# Altium PCB Zotino.PCBDOC (part 7 of 10)
Units mm, origin at the board's own origin, x right, y up, seen from the top; angles counter-clockwise.
Board outline 160.1 x 100.1 mm, 4 copper layers (TopLayer, Internal Plane 2, Signal Layer 1, BottomLayer), stack 1.563 mm thick; 759 components, 378 nets, 2272 pads, 779 vias.
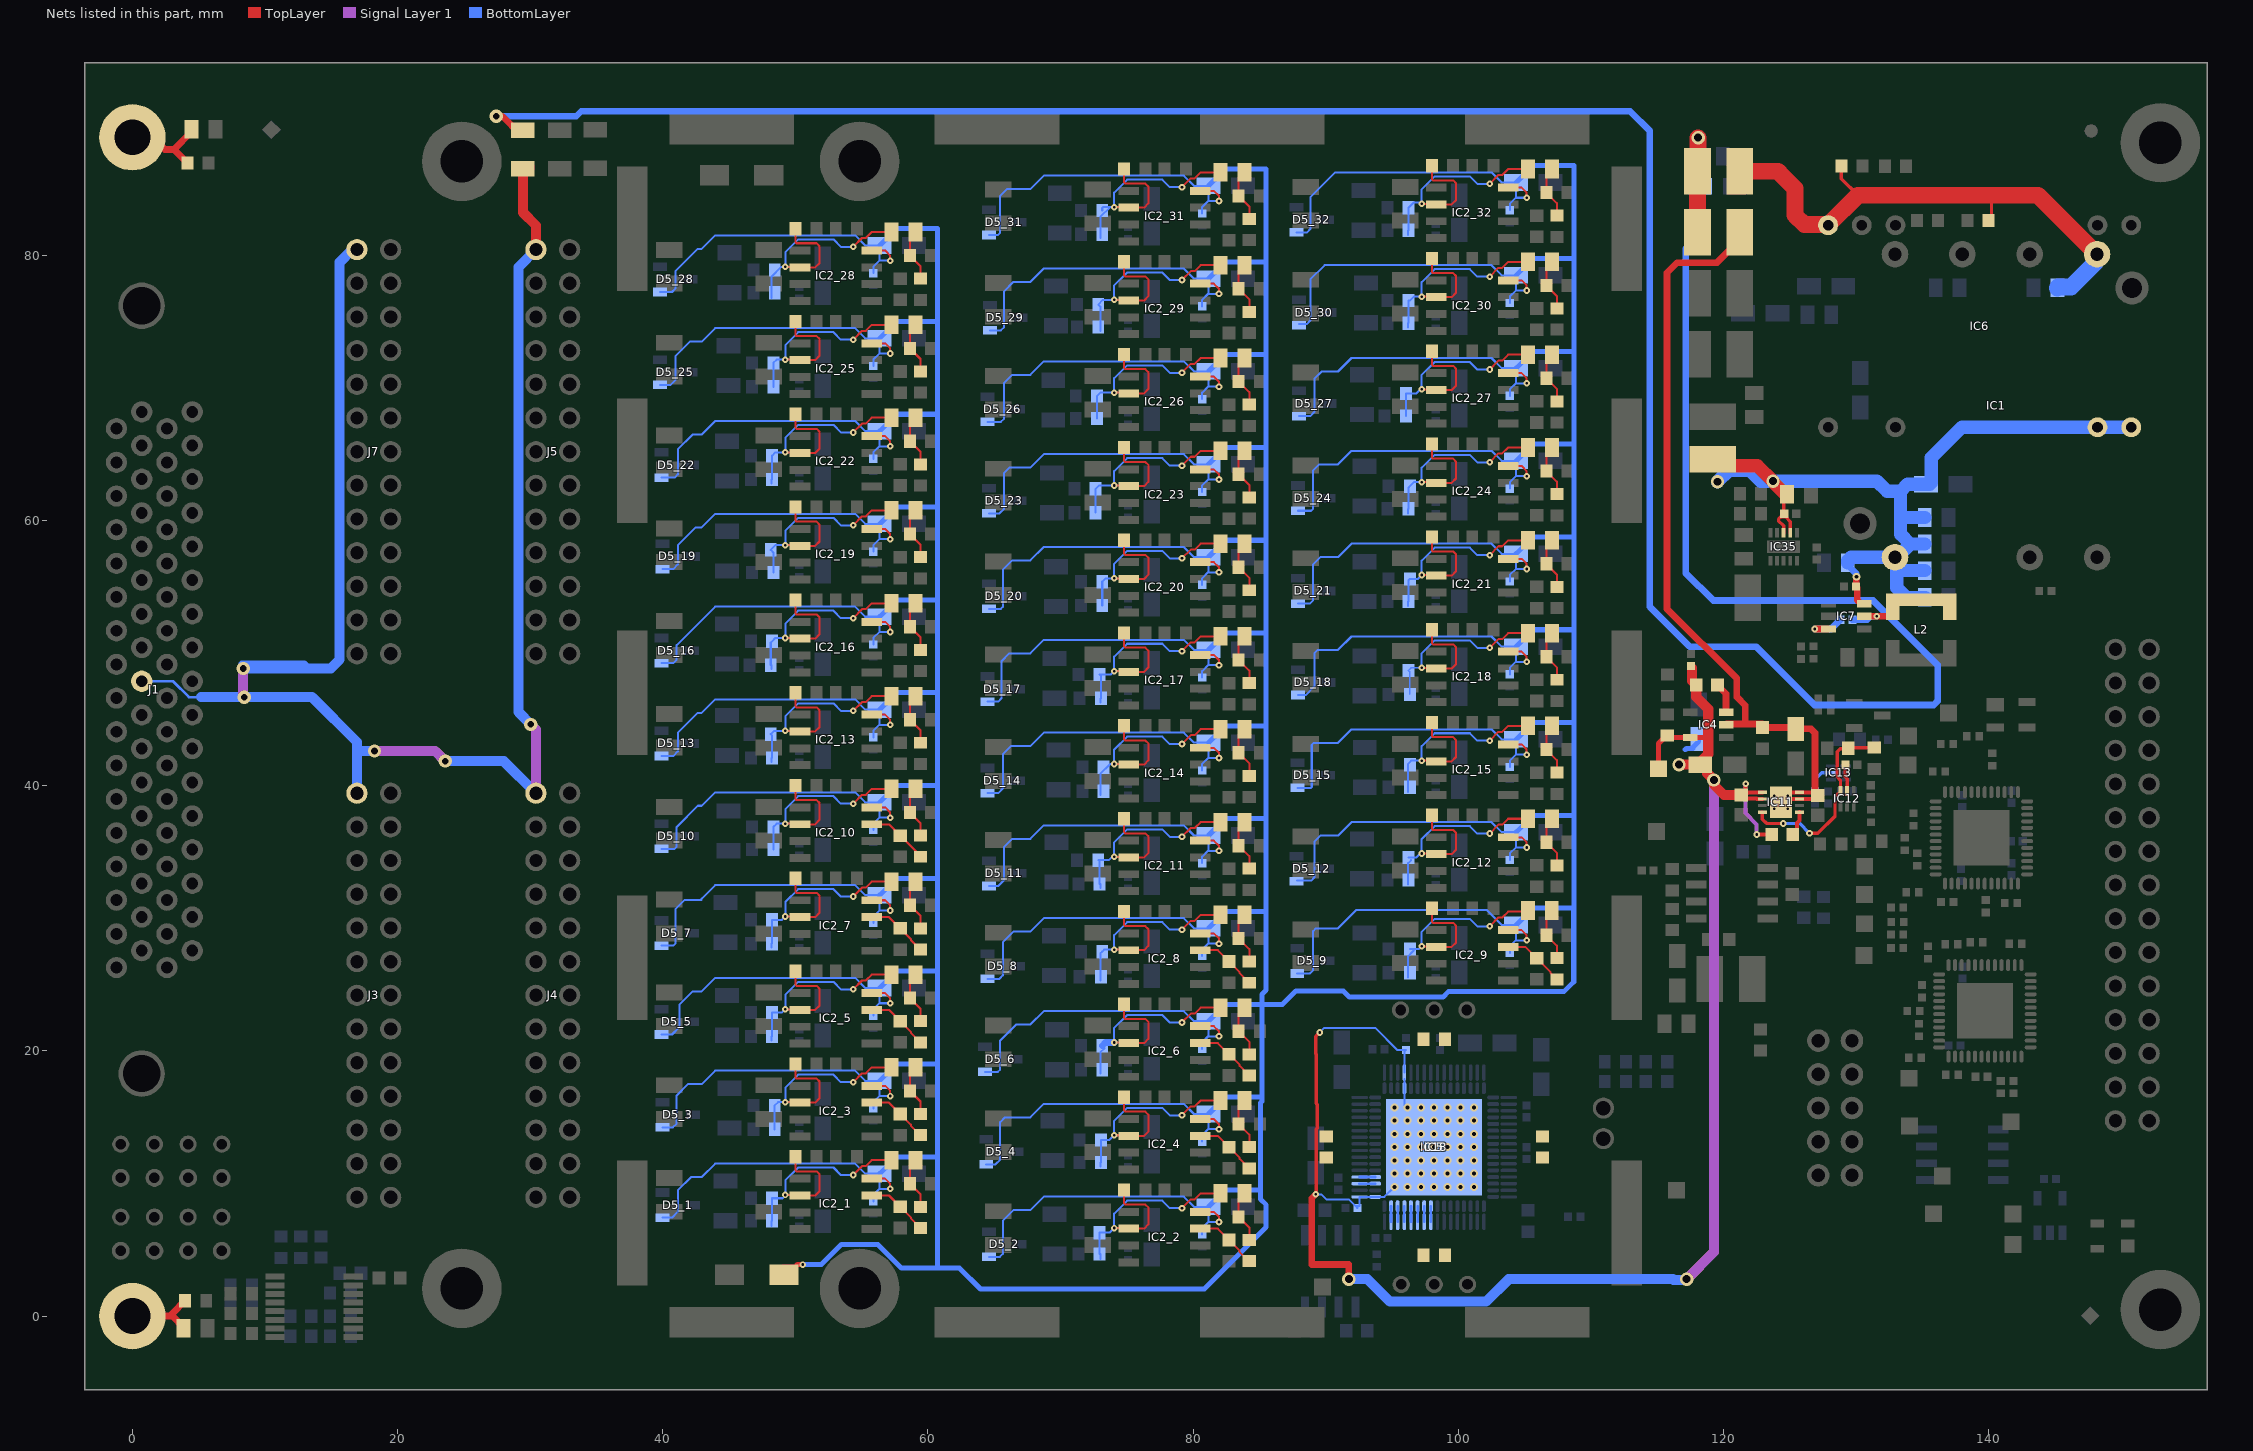
[diagram p7: the nets of this part, all layers, seen from the top]

## Via types
v1: diameter 0.5, hole 0.2, TopLayer to BottomLayer, tented both sides, 659 vias
v2: diameter 0.6, hole 0.3, TopLayer to BottomLayer, tented both sides, 56 vias
v3: diameter 1, hole 0.6, TopLayer to BottomLayer, tented both sides, 26 vias
v4: diameter 0.6, hole 0.3, TopLayer to BottomLayer, 18 vias
v5: diameter 1, hole 0.5, TopLayer to BottomLayer, tented both sides, 9 vias
v6: diameter 0.5, hole 0.2, TopLayer to BottomLayer, tented bottom, 7 vias
v7: diameter 0.5, hole 0.2, TopLayer to BottomLayer, 4 vias

## Nets (pads, with @x,y where several pads share a name; then routed paths per layer and width w, separated by ;. In a path a pad name is that pad's centre, name@x,y a point inside that pad or via, vN(x,y) a via of type N, cw(c..) or ccw(c..) an arc to the next point about the centre after c; other vN are vias at no path point) (continued)
N12V0A: C1.2 C5.2 C6.1 C27.1 C29.2 C50.2 C53.2 C92_1.2 C92_2.2 C92_3.2 C92_4.2 C92_5.2 C92_6.2 C92_7.2 C92_8.2 C92_9.2 C92_10.2 C92_11.2 C92_12.2 C92_13.2 C92_14.2 C92_15.2 C92_16.2 C92_17.2 C92_18.2 C92_19.2 C92_20.2 C92_21.2 C92_22.2 C92_23.2 C92_24.2 C92_25.2 C92_26.2 C92_27.2 C92_28.2 C92_29.2 C92_30.2 C92_31.2 C92_32.2 C93_1.2 C93_2.2 C93_3.2 C93_4.2 C93_5.2 C93_6.2 C93_7.2 C93_8.2 C93_9.2 C93_10.2 C93_11.2 C93_12.2 C93_13.2 C93_14.2 C93_15.2 C93_16.2 C93_17.2 C93_18.2 C93_19.2 C93_20.2 C93_21.2 C93_22.2 C93_23.2 C93_24.2 C93_25.2 C93_26.2 C93_27.2 C93_28.2 C93_29.2 C93_30.2 C93_31.2 C93_32.2 C147.2 D2.2 D5_1.1 D5_2.1 D5_3.1 D5_4.1 D5_5.1 D5_6.1 D5_7.1 D5_8.1 D5_9.1 D5_10.1 D5_11.1 D5_12.1 D5_13.1 D5_14.1 D5_15.1 D5_16.1 D5_17.1 D5_18.1 D5_19.1 D5_20.1 D5_21.1 D5_22.1 D5_23.1 D5_24.1 D5_25.1 D5_26.1 D5_27.1 D5_28.1 D5_29.1 D5_30.1 D5_31.1 D5_32.1 IC2_1.4 IC2_2.4 IC2_3.4 IC2_4.4 IC2_5.4 IC2_6.4 IC2_7.4 IC2_8.4 IC2_9.4 IC2_10.4 IC2_11.4 IC2_12.4 IC2_13.4 IC2_14.4 IC2_15.4 IC2_16.4 IC2_17.4 IC2_18.4 IC2_19.4 IC2_20.4 IC2_21.4 IC2_22.4 IC2_23.4 IC2_24.4 IC2_25.4 IC2_26.4 IC2_27.4 IC2_28.4 IC2_29.4 IC2_30.4 IC2_31.4 IC2_32.4 IC4.5 IC5.17 IC5.36 IC11.1 IC11.2 IC18.17 IC18.36 IC18.65 R8.1 R8.2 R9.1 R9.2 R10.1 R10.2 R12.1 R12.2 R69.2 TP9.1 | length 1380.1
  TopLayer w0.152: IC2_1.4@55.751,10.363 56.769,10.363 57.15,9.982 v1(57.15,9.594) ; IC2_3.4@55.751,17.363 56.769,17.363 57.15,16.982 v1(57.15,16.594) ; IC2_5.4@55.751,24.363 56.769,24.363 57.15,23.982 v1(57.15,23.594) ; IC2_7.4@55.751,31.363 56.769,31.363 57.15,30.982 v1(57.15,30.594) ; IC2_10.4@55.751,38.363 56.769,38.363 57.15,37.982 v1(57.15,37.594) ; IC2_13.4@55.751,45.363 56.769,45.363 57.15,44.982 v1(57.15,44.594) ; IC2_16.4@55.751,52.363 56.769,52.363 57.15,51.982 v1(57.15,51.594) ; IC2_19.4@55.751,59.363 56.769,59.363 57.15,58.982 v1(57.15,58.594) ; IC2_22.4@55.751,66.363 56.769,66.363 57.15,65.982 v1(57.15,65.594) ; IC2_25.4@55.751,73.363 56.769,73.363 57.15,72.982 v1(57.15,72.594) ; IC2_28.4@55.751,80.363 56.769,80.363 57.15,79.982 v1(57.15,79.594) ; IC2_2.4@80.551,7.863 81.569,7.863 81.95,7.482 v1(81.95,7.094) ; IC2_4.4@80.551,14.863 81.569,14.863 81.95,14.482 v1(81.95,14.094) ; IC2_6.4@80.551,21.863 81.569,21.863 81.95,21.482 v1(81.95,21.094) ; IC2_8.4@80.551,28.863 81.569,28.863 81.95,28.482 v1(81.95,28.094) ; IC2_11.4@80.551,35.863 81.569,35.863 81.95,35.482 v1(81.95,35.094) ; IC2_14.4@80.551,42.863 81.569,42.863 81.95,42.482 v1(81.95,42.094) ; IC2_17.4@80.551,49.863 81.569,49.863 81.95,49.482 v1(81.95,49.094) ; IC2_20.4@80.551,56.863 81.569,56.863 81.95,56.482 v1(81.95,56.094) ; IC2_23.4@80.551,63.863 81.569,63.863 81.95,63.482 v1(81.95,63.094) ; IC2_26.4@80.551,70.863 81.569,70.863 81.95,70.482 v1(81.95,70.094) ; IC2_29.4@80.551,77.863 81.569,77.863 81.95,77.482 v1(81.95,77.094) ; IC2_31.4@80.551,84.863 81.569,84.863 81.95,84.482 v1(81.95,84.094) ; IC2_9.4@103.751,29.113 104.769,29.113 105.15,28.732 v1(105.15,28.344) ; IC2_12.4@103.751,36.113 104.769,36.113 105.15,35.732 v1(105.15,35.344) ; IC2_15.4@103.751,43.113 104.769,43.113 105.15,42.732 v1(105.15,42.344) ; IC2_18.4@103.751,50.113 104.769,50.113 105.15,49.732 v1(105.15,49.344) ; IC2_21.4@103.751,57.113 104.769,57.113 105.15,56.732 v1(105.15,56.344) ; IC2_24.4@103.751,64.113 104.769,64.113 105.15,63.732 v1(105.15,63.344) ; IC2_27.4@103.751,71.113 104.769,71.113 105.15,70.732 v1(105.15,70.344) ; IC2_30.4@103.751,78.113 104.769,78.113 105.15,77.732 v1(105.15,77.344) ; IC2_32.4@103.751,85.113 104.769,85.113 105.15,84.732 v1(105.15,84.344)
  TopLayer w0.254: v1(89.244,9.188) 89.29,9.234 89.29,14.102 89.36,14.172 89.36,15.96 89.29,16.03 89.29,19.461 89.283,19.468 89.283,19.76 89.244,19.799 89.244,21.088 v1(89.544,21.388)
  TopLayer w0.3: C29.2@121.637,39.303 121.839,39.505 IC11.1@122.934,39.505 ; v1(121.669,40.142) 121.669,39.64 C29.2@121.332,39.303 121.629,39.005 121.647,39.023 122.498,39.023 122.516,39.005 IC11.2@122.934,39.005 ; v1(122.503,36.321) 123.628,36.321 C27.1@123.631,36.319
  TopLayer w0.381: D2.2@49.107,3.694 49.952,3.694 50.144,3.886 v1(50.546,3.886) ; TP9.1@115.102,41.28 115.102,43.182 115.702,43.782 115.93,43.782 116.074,43.638 IC4.5@117.45,43.638 ; IC4.5@117.366,43.554 IC4.5@117.45,43.638 ; 118.844,43.588 118.794,43.638 IC4.5@117.494,43.638 IC4.5@117.45,43.638
  TopLayer w0.508: v1(89.244,9.188) 88.944,8.888 88.944,3.888 91.744,3.888 v3(91.744,2.788)
  TopLayer w0.762: v3(116.649,41.588) C1.2@118.244,41.588 ; C5.2@117.627,48.888 117.627,47.905 C6.1@117.944,47.588 117.944,46.688 118.844,45.788 118.844,43.588 118.844,42.388 118.244,41.788 C1.2@118.244,41.588 ; C29.2@121.332,39.303 120.03,39.303 119.313,40.019 119.313,40.393 v3(119.268,40.438) 118.763,40.943 118.763,41.344 118.519,41.588 C1.2@118.244,41.588
  Signal Layer 1 w0.3: v1(121.669,40.142) 121.642,40.116 121.642,37.946 122.503,37.086 v1(122.503,36.321)
  Signal Layer 1 w0.762: v3(117.219,2.788) 119.268,4.837 v3(119.268,40.438)
  BottomLayer w0.152: D5_25.1@39.794,70.238 40.594,70.238 40.944,70.588 40.944,72.388 42.046,73.49 42.926,73.49 43.942,74.506 54.503,74.506 55.265,73.744 C93_25.2@56.358,73.744 56.358,72.624 ; D5_28.1@39.794,77.238 40.694,77.238 40.944,77.488 40.944,78.788 42.646,80.49 42.926,80.49 43.942,81.506 54.503,81.506 55.265,80.744 C93_28.2@56.358,80.744 56.358,79.624 ; D5_5.1@39.894,21.238 40.694,21.238 41.244,21.788 41.244,23.488 42.246,24.49 42.926,24.49 43.942,25.506 54.503,25.506 55.265,24.744 C93_5.2@56.358,24.744 56.358,23.624 ; D5_7.1@39.894,27.938 40.794,27.938 40.944,28.088 40.944,30.688 41.644,31.388 42.926,31.388 42.926,31.49 43.942,32.506 54.503,32.506 55.265,31.744 C93_7.2@56.358,31.744 56.358,30.624 ; D5_10.1@39.894,35.238 40.894,35.238 41.044,35.388 41.044,36.888 42.646,38.49 42.926,38.49 43.942,39.506 54.503,39.506 55.265,38.744 C93_10.2@56.358,38.744 56.358,37.624 ; D5_13.1@39.894,42.238 40.794,42.238 41.144,42.588 41.144,43.988 42.646,45.49 42.926,45.49 43.942,46.506 54.503,46.506 55.265,45.744 C93_13.2@56.358,45.744 56.358,44.624 ; D5_16.1@39.894,49.238 40.794,49.238 41.044,49.488 41.044,50.608 43.942,53.506 54.503,53.506 55.265,52.744 C93_16.2@56.358,52.744 56.358,51.624 ; D5_22.1@39.894,63.238 40.894,63.238 41.144,63.488 41.144,65.388 42.246,66.49 42.926,66.49 43.942,67.506 54.503,67.506 55.265,66.744 C93_22.2@56.358,66.744 56.358,65.624 ; D5_1.1@39.994,7.419 40.694,7.419 41.144,7.869 41.144,9.488 42.146,10.49 42.926,10.49 43.942,11.506 54.503,11.506 55.265,10.744 C93_1.2@56.358,10.744 56.358,9.624 ; D5_3.1@39.994,14.238 40.766,14.238 41.044,14.516 41.044,16.638 41.896,17.49 42.926,17.49 43.942,18.506 54.503,18.506 55.265,17.744 C93_3.2@56.358,17.744 56.358,16.624 ; D5_19.1@39.994,56.338 40.794,56.338 41.144,56.688 41.144,58.139 42.496,59.49 42.926,59.49 43.942,60.506 54.503,60.506 55.265,59.744 C93_19.2@56.358,59.744 56.358,58.624 ; C92_1.2@55.88,8.654 55.88,9.146 56.358,9.624 ; C92_3.2@55.88,15.654 55.88,16.146 56.358,16.624 ; C92_5.2@55.88,22.654 55.88,23.146 56.358,23.624 ; C92_7.2@55.88,29.654 55.88,30.146 56.358,30.624 ; C92_10.2@55.88,36.654 55.88,37.146 56.358,37.624 ; C92_13.2@55.88,43.654 55.88,44.146 56.358,44.624 ; C92_16.2@55.88,50.654 55.88,51.146 56.358,51.624 ; C92_19.2@55.88,57.654 55.88,58.146 56.358,58.624 ; C92_22.2@55.88,64.654 55.88,65.146 56.358,65.624 ; C92_25.2@55.88,71.654 55.88,72.146 56.358,72.624 ; C92_28.2@55.88,78.654 55.88,79.146 56.358,79.624 ; v1(57.15,9.594) 56.388,9.594 56.358,9.624 ; v1(57.15,16.594) 56.388,16.594 56.358,16.624 ; v1(57.15,23.594) 56.388,23.594 56.358,23.624 ; v1(57.15,30.594) 56.388,30.594 56.358,30.624 ; v1(57.15,37.594) 56.388,37.594 56.358,37.624 ; v1(57.15,44.594) 56.388,44.594 56.358,44.624 ; v1(57.15,51.594) 56.388,51.594 56.358,51.624 ; v1(57.15,58.594) 56.388,58.594 56.358,58.624 ; v1(57.15,65.594) 56.388,65.594 56.358,65.624 ; v1(57.15,72.594) 56.388,72.594 56.358,72.624 ; v1(57.15,79.594) 56.388,79.594 56.358,79.624 ; D5_6.1@64.31,18.419 65.275,18.419 65.444,18.588 65.444,20.788 66.646,21.99 67.726,21.99 68.742,23.006 79.303,23.006 80.065,22.244 C93_6.2@81.158,22.244 81.158,21.124 ; D5_4.1@64.394,11.438 65.094,11.438 65.444,11.788 65.444,14.626 65.808,14.99 67.726,14.99 68.742,16.006 79.303,16.006 80.065,15.244 C93_4.2@81.158,15.244 81.158,14.124 ; D5_17.1@64.494,46.338 65.294,46.338 65.544,46.588 65.544,49.388 66.146,49.99 67.726,49.99 68.742,51.006 79.303,51.006 80.065,50.244 C93_17.2@81.158,50.244 81.158,49.124 ; D5_26.1@64.494,67.438 65.494,67.438 65.744,67.688 65.744,70.388 66.346,70.99 67.726,70.99 68.742,72.006 79.303,72.006 80.065,71.244 C93_26.2@81.158,71.244 81.158,70.124 ; D5_8.1@64.499,25.438 65.394,25.438 65.649,25.693 65.649,28.193 66.446,28.99 67.726,28.99 68.742,30.006 79.303,30.006 80.065,29.244 C93_8.2@81.158,29.244 81.158,28.124 ; D5_14.1@64.499,39.438 65.294,39.438 65.644,39.788 65.644,42.388 66.246,42.99 67.726,42.99 68.742,44.006 79.303,44.006 80.065,43.244 C93_14.2@81.158,43.244 81.158,42.124 ; D5_2.1@64.594,4.469 65.425,4.469 65.644,4.688 65.644,7.188 66.446,7.99 67.726,7.99 68.742,9.006 79.303,9.006 80.065,8.244 C93_2.2@81.158,8.244 81.158,7.124 ; D5_11.1@64.594,32.438 65.294,32.438 65.744,32.888 65.744,35.388 66.346,35.99 67.726,35.99 68.742,37.006 79.303,37.006 80.065,36.244 C93_11.2@81.158,36.244 81.158,35.124 ; D5_20.1@64.594,53.338 65.494,53.338 65.644,53.488 65.644,56.288 66.346,56.99 67.726,56.99 68.742,58.006 79.303,58.006 80.065,57.244 C93_20.2@81.158,57.244 81.158,56.124 ; D5_23.1@64.594,60.538 65.394,60.538 65.744,60.888 65.744,63.588 66.146,63.99 67.726,63.99 68.742,65.006 79.303,65.006 80.065,64.244 C93_23.2@81.158,64.244 81.158,63.124 ; D5_31.1@64.599,81.538 65.289,81.538 65.449,81.698 65.449,84.493 65.946,84.99 67.726,84.99 68.742,86.006 79.303,86.006 80.065,85.244 C93_31.2@81.158,85.244 81.158,84.124 ; D5_29.1@64.694,74.338 65.494,74.338 65.744,74.588 65.744,77.288 66.446,77.99 67.726,77.99 68.742,79.006 79.303,79.006 80.065,78.244 C93_29.2@81.158,78.244 81.158,77.124 ; C92_2.2@80.68,6.154 80.68,6.646 81.158,7.124 ; C92_4.2@80.68,13.154 80.68,13.646 81.158,14.124 ; C92_6.2@80.68,20.154 80.68,20.646 81.158,21.124 ; C92_8.2@80.68,27.154 80.68,27.646 81.158,28.124 ; C92_11.2@80.68,34.154 80.68,34.646 81.158,35.124 ; C92_14.2@80.68,41.154 80.68,41.646 81.158,42.124 ; C92_17.2@80.68,48.154 80.68,48.646 81.158,49.124 ; C92_20.2@80.68,55.154 80.68,55.646 81.158,56.124 ; C92_23.2@80.68,62.154 80.68,62.646 81.158,63.124 ; C92_26.2@80.68,69.154 80.68,69.646 81.158,70.124 ; C92_29.2@80.68,76.154 80.68,76.646 81.158,77.124 ; C92_31.2@80.68,83.154 80.68,83.646 81.158,84.124 ; v1(81.95,7.094) 81.188,7.094 81.158,7.124 ; v1(81.95,14.094) 81.188,14.094 81.158,14.124 ; v1(81.95,21.094) 81.188,21.094 81.158,21.124 ; v1(81.95,28.094) 81.188,28.094 81.158,28.124 ; v1(81.95,35.094) 81.188,35.094 81.158,35.124 ; v1(81.95,42.094) 81.188,42.094 81.158,42.124 ; v1(81.95,49.094) 81.188,49.094 81.158,49.124 ; v1(81.95,56.094) 81.188,56.094 81.158,56.124 ; v1(81.95,63.094) 81.188,63.094 81.158,63.124 ; v1(81.95,70.094) 81.188,70.094 81.158,70.124 ; v1(81.95,77.094) 81.188,77.094 81.158,77.124 ; v1(81.95,84.094) 81.188,84.094 81.158,84.124 ; D5_32.1@87.794,81.738 88.594,81.738 88.844,81.988 88.844,84.388 90.712,86.256 102.503,86.256 103.265,85.494 C93_32.2@104.358,85.494 104.358,84.374 ; D5_9.1@87.849,25.838 88.794,25.838 89.044,26.088 89.044,29.036 89.248,29.24 90.926,29.24 92.311,30.626 102.133,30.626 103.265,29.494 C93_9.2@104.358,29.494 104.358,28.374 ; D5_12.1@87.849,32.838 88.894,32.838 89.135,33.079 89.135,35.779 89.596,36.24 90.926,36.24 91.942,37.256 102.503,37.256 103.265,36.494 C93_12.2@104.358,36.494 104.358,35.374 ; D5_15.1@87.875,39.838 88.894,39.838 88.944,39.888 88.944,43.088 89.096,43.24 90.926,43.24 91.942,44.256 102.503,44.256 103.265,43.494 C93_15.2@104.358,43.494 104.358,42.374 ; D5_18.1@87.894,46.838 88.494,46.838 89.144,47.488 89.144,49.988 89.396,50.24 90.926,50.24 91.942,51.256 102.503,51.256 103.265,50.494 C93_18.2@104.358,50.494 104.358,49.374 ; D5_21.1@87.894,53.738 88.794,53.738 89.044,53.988 89.044,56.688 89.596,57.24 90.926,57.24 91.942,58.256 102.503,58.256 103.265,57.494 C93_21.2@104.358,57.494 104.358,56.374 ; D5_24.1@87.894,60.738 88.894,60.738 89.044,60.888 89.044,63.788 89.496,64.24 90.926,64.24 91.942,65.256 102.503,65.256 103.265,64.494 C93_24.2@104.358,64.494 104.358,63.374 ; D5_27.1@87.994,67.874 88.83,67.874 89.144,68.188 89.144,70.688 89.696,71.24 90.926,71.24 91.942,72.256 102.503,72.256 103.265,71.494 C93_27.2@104.358,71.494 104.358,70.374 ; D5_30.1@87.994,74.838 88.594,74.838 88.844,75.088 88.844,78.188 89.912,79.256 102.503,79.256 103.265,78.494 C93_30.2@104.358,78.494 104.358,77.374 ; v1(89.244,9.188) 89.664,9.188 90.051,8.801 91.743,8.801 C53.2@92.256,8.288 ; v1(89.544,21.388) 89.898,21.742 93.723,21.742 95.396,20.069 C50.2@96.044,20.069 95.926,19.952 IC5.36@95.926,18.363 ; C53.2@92.394,8.143 92.394,8.15 C53.2@92.256,8.288 ; v2(95.176,9.738) 94.426,8.988 IC18.17@93.726,8.988 IC5.17@92.551,8.988 92.551,8.288 C53.2@92.256,8.288 ; IC18.65@95.926,15.888 IC18.36@95.926,17.188 IC5.36@95.926,17.871 ; C92_9.2@103.88,27.404 103.88,27.896 104.358,28.374 ; C92_12.2@103.88,34.404 103.88,34.896 104.358,35.374 ; C92_15.2@103.88,41.404 103.88,41.896 104.358,42.374 ; C92_18.2@103.88,48.404 103.88,48.896 104.358,49.374 ; C92_21.2@103.88,55.404 103.88,55.896 104.358,56.374 ; C92_24.2@103.88,62.404 103.88,62.896 104.358,63.374 ; C92_27.2@103.88,69.404 103.88,69.896 104.358,70.374 ; C92_30.2@103.88,76.404 103.88,76.896 104.358,77.374 ; C92_32.2@103.88,83.404 103.88,83.896 104.358,84.374 ; v1(105.15,28.344) 104.388,28.344 104.358,28.374 ; v1(105.15,35.344) 104.388,35.344 104.358,35.374 ; v1(105.15,42.344) 104.388,42.344 104.358,42.374 ; v1(105.15,49.344) 104.388,49.344 104.358,49.374 ; v1(105.15,56.344) 104.388,56.344 104.358,56.374 ; v1(105.15,63.344) 104.388,63.344 104.358,63.374 ; v1(105.15,70.344) 104.388,70.344 104.358,70.374 ; v1(105.15,77.344) 104.388,77.344 104.358,77.374 ; v1(105.15,84.344) 104.388,84.344 104.358,84.374
  BottomLayer w0.381: v1(50.546,3.886) 51.95,3.886 53.47,5.406 56.218,5.406 57.992,3.632 60.706,3.632 ; C93_1.2@56.358,10.744 57.628,12.014 60.706,12.014 ; C93_3.2@56.358,17.744 57.628,19.014 60.706,19.014 ; C93_5.2@56.358,24.744 57.628,26.014 60.706,26.014 ; C93_7.2@56.358,31.744 57.628,33.014 60.706,33.014 ; C93_10.2@56.358,38.744 57.628,40.014 60.706,40.014 ; C93_13.2@56.358,45.744 57.628,47.014 60.706,47.014 ; C93_16.2@56.358,52.744 57.628,54.014 60.706,54.014 ; C93_19.2@56.358,59.744 57.628,61.014 60.706,61.014 ; C93_22.2@56.358,66.744 57.628,68.014 60.706,68.014 ; C93_25.2@56.358,73.744 57.628,75.014 60.706,75.014 ; C93_28.2@56.358,80.744 57.628,82.014 60.706,82.014 60.706,75.014 ; C93_2.2@81.158,8.244 82.428,9.514 85.076,9.514 ; C93_4.2@81.158,15.244 82.428,16.514 85.176,16.514 ; C93_6.2@81.158,22.244 82.428,23.514 85.176,23.514 ; C93_8.2@81.158,29.244 82.428,30.514 85.506,30.514 ; C93_11.2@81.158,36.244 82.428,37.514 85.506,37.514 ; C93_14.2@81.158,43.244 82.428,44.514 85.506,44.514 ; C93_17.2@81.158,50.244 82.428,51.514 85.506,51.514 ; C93_20.2@81.158,57.244 82.428,58.514 85.506,58.514 ; C93_23.2@81.158,64.244 82.428,65.514 85.506,65.514 ; C93_26.2@81.158,71.244 82.428,72.514 85.506,72.514 ; C93_29.2@81.158,78.244 82.428,79.514 85.506,79.514 ; C93_31.2@81.158,85.244 82.428,86.514 85.506,86.514 85.506,79.514 ; C93_9.2@104.358,29.494 105.628,30.764 108.706,30.764 ; C93_12.2@104.358,36.494 105.628,37.764 108.706,37.764 ; C93_15.2@104.358,43.494 105.628,44.764 108.706,44.764 ; C93_18.2@104.358,50.494 105.628,51.764 108.706,51.764 ; C93_21.2@104.358,57.494 105.628,58.764 108.706,58.764 ; C93_24.2@104.358,64.494 105.628,65.764 108.706,65.764 ; C93_27.2@104.358,71.494 105.628,72.764 108.706,72.764 ; C93_30.2@104.358,78.494 105.628,79.764 108.706,79.764 ; C93_32.2@104.358,85.494 105.628,86.764 108.706,86.764 ; 108.712,86.764 108.712,30.77 108.706,30.764 ; 117.094,42.738 117.126,42.738 117.211,42.823 117.683,42.823 117.683,42.888 118.118,43.322 C147.2@118.118,43.532 ; 60.706,3.632 62.368,3.632 63.955,2.046 80.839,2.046 85.506,6.713 85.506,8.388 85.076,8.818 85.076,9.514 ; 60.706,3.632 60.706,12.014 ; 60.706,12.014 60.706,19.014 ; 60.706,19.014 60.706,26.014 ; 60.706,26.014 60.706,33.014 ; 60.706,33.014 60.706,40.014 ; 60.706,40.014 60.706,47.014 ; 60.706,47.014 60.706,54.014 ; 60.706,54.014 60.706,61.014 ; 60.706,61.014 60.706,68.014 ; 60.706,68.014 60.706,75.014 ; 85.076,9.514 85.076,16.085 85.176,16.185 85.176,16.514 ; 85.176,16.514 85.176,23.514 ; 85.176,23.514 85.176,24.259 85.506,24.588 85.506,30.514 ; 85.176,23.514 86.739,23.514 87.744,24.52 91.324,24.52 91.788,24.056 98.84,24.056 99.278,24.494 107.984,24.494 108.706,25.216 108.706,30.764 ; 85.506,30.514 85.506,37.514 ; 85.506,37.514 85.506,44.514 ; 85.506,44.514 85.506,51.514 ; 85.506,51.514 85.506,58.514 ; 85.506,58.514 85.506,65.514 ; 85.506,65.514 85.506,72.514 ; 85.506,72.514 85.506,79.514
  BottomLayer w0.762: v3(91.744,2.788) 93.144,2.788 94.844,1.088 102.094,1.088 103.794,2.788 116.172,2.788 116.23,2.73 117.161,2.73 v3(117.219,2.788)
  other v2: 96.176,9.738 97.176,9.738 98.176,9.738 99.176,9.738 100.176,9.738 101.176,9.738 95.176,10.738 96.176,10.738 97.176,10.738 98.176,10.738 99.176,10.738 100.176,10.738 101.176,10.738 95.176,11.738 96.176,11.738 97.176,11.738 98.176,11.738 99.176,11.738 100.176,11.738 101.176,11.738 95.176,12.738 96.176,12.738 97.176,12.738 98.176,12.738 99.176,12.738 100.176,12.738 101.176,12.738 95.176,13.738 96.176,13.738 97.176,13.738 98.176,13.738 99.176,13.738 100.176,13.738 101.176,13.738 95.176,14.738 96.176,14.738 97.176,14.738 98.176,14.738 99.176,14.738 100.176,14.738 101.176,14.738 95.176,15.738 96.176,15.738 97.176,15.738 98.176,15.738 99.176,15.738 100.176,15.738 101.176,15.738
N13V0: C141.2 IC1.4 IC6.11 L9.1 R4.1 R27.1 | length 41.7
  TopLayer w0.254: R27.1@128.887,86.732 128.887,85.788 130.142,84.532 ; R4.1@139.992,82.626 140.208,82.842 140.208,84.532
  TopLayer w1.27: L9.1@121.237,86.342 124.1,86.342 124.53,85.912 125.394,85.048 125.394,83.021 126.094,82.321 127.843,82.321 IC6.11@127.887,82.277 130.142,84.532 140.208,84.532 143.731,84.532 IC1.4@148.18,80.083
  BottomLayer w1.27: C141.2@145.172,77.546 145.237,77.611 146.218,77.611 148.032,79.425 148.032,79.947 IC1.4@148.172,80.086
N13V0_SCSI: J1.52 J3.26 J4.26 J5.26 J7.26 R32.2 | length 132
  TopLayer w0.762: R32.2@29.444,86.538 29.444,83.249 30.436,82.256 J5.26@30.436,80.434 ; R32.2@29.957,86.538 R32.2@29.957,86.694
  Signal Layer 1 w0.762: v5@8.353,46.841 v5(8.353,48.841) ; v5(18.259,42.618) 22.831,42.618 v5(23.593,41.856) ; v5(30.052,44.625) 30.436,44.241 J4.26@30.436,39.434
  BottomLayer w0.203: J1.52@0.704,47.879 3.059,47.879 4.256,46.682 5.167,46.682
  BottomLayer w0.508: v5@8.251,49.205 12.944,49.205 13.308,48.841 13.33,48.819
  BottomLayer w0.762: 5.167,46.682 v5(8.444,46.682) 13.56,46.682 16.936,43.305 16.936,42.618 ; v5(8.353,48.841) 13.308,48.841 14.957,48.841 15.628,49.513 15.628,79.485 16.578,80.434 J7.26@16.936,80.434 ; J3.26@16.936,39.434 16.936,42.618 ; v5(18.259,42.618) 16.936,42.618 ; v5(23.593,41.856) 28.014,41.856 J4.26@30.436,39.434 ; v5(30.052,44.625) 29.128,45.549 29.128,79.126 J5.26@30.436,80.434
N_LDO_EN: C32.2 IC11.4 IC12.6 R35.2 | length 15.2
  TopLayer w0.254: IC11.4@122.934,38.005 122.93,38.005 122.928,38.003 122.928,37.465 123.241,37.152 v1(124.491,37.152) ; v1(126.483,36.411) 127.109,36.411 128.408,37.71 128.408,39.2 128.557,39.349 128.804,39.349 128.804,39.584 IC12.6@128.817,39.597 128.817,40.43 128.581,40.666 128.581,42.58 128.795,42.794 129.393,42.794 C32.2@129.416,42.817 129.472,42.873 R35.2@131.361,42.873
  BottomLayer w0.254: v1(124.491,37.152) 125.741,37.152 v1(126.483,36.411)
nc9: IC5.9 IC18.9 | length 1.2
  BottomLayer w0.2: IC5.9@97.926,7.113 IC18.9@97.926,8.288
nc10: IC5.10 IC18.10 | length 1.2
  BottomLayer w0.2: IC5.10@97.426,7.113 IC18.10@97.426,8.288
nc11: IC5.11 IC18.11 | length 1.2
  BottomLayer w0.2: IC5.11@96.926,7.113 IC18.11@96.926,8.288
nc12: IC5.12 IC18.12 | length 1.2
  BottomLayer w0.2: IC5.12@96.426,7.113 IC18.12@96.426,8.288
nc13: IC5.13 IC18.13 | length 1.2
  BottomLayer w0.2: IC5.13@95.926,7.113 IC18.13@95.926,8.288
nc14: IC5.14 IC18.14 | length 1.2
  BottomLayer w0.2: IC5.14@95.426,7.113 IC18.14@95.426,8.288
nc15: IC5.15 IC18.15 | length 1.2
  BottomLayer w0.2: IC5.15@94.926,7.113 IC18.15@94.926,8.288
nc19: IC5.19 IC18.19 | length 1.2
  BottomLayer w0.2: IC5.19@92.551,9.988 IC18.19@93.726,9.988
nc20: IC5.20 IC18.20 | length 1.2
  BottomLayer w0.2: IC5.20@92.551,10.488 IC18.20@93.726,10.488
NetB1_1: B1.1 C11.1 R28.2 | length 5.1
  TopLayer w0.508: B1.1@1.844,88.588 2.444,87.988 3.134,87.988 ; R28.2@4.144,86.967 3.134,87.977 3.134,87.988 ; C11.1@4.465,89.519 4.465,89.32 3.134,87.988
NetB7_1: B7.1 C15.1 R29.2 | length 5.9
  TopLayer w0.508: B7.1@0,0 3.017,0 ; C15.1@3.868,-0.931 3.868,-0.851 3.017,0 ; R29.2@3.968,1.161 3.017,0.211 3.017,0
NetC2_2: C2.2 C142.2 L9.2 L15.1 R32.1 | length 215.8
  TopLayer w0.508: v5(27.444,90.488) 27.9,90.488 R32.1@29.237,89.151
  TopLayer w1.27: L15.1@118.037,81.939 L9.2@118.037,86.342 118.085,86.389 v3(118.085,88.875)
  BottomLayer w0.508: v5(27.444,90.488) 33.472,90.488 33.853,90.869 112.961,90.869 114.444,89.386 114.444,53.488 117.444,50.488 122.444,50.488 126.85,46.082 135.852,46.082 136.15,46.38 136.15,49.102 131.288,53.964 119.229,53.964 117.145,56.048 117.145,80.489 118.244,81.588 118.244,85.085 118.085,85.245 v3(118.085,88.875)
NetC3_2: C3.2 C28.2 C144.2 IC4.2 IC11.7 IC11.8 IC11.9 L15.2 | length 60
  TopLayer w0.3: IC11.9@123.659,38.005 124.334,38.68 IC11.9@124.334,38.755 ; IC11.9@125.009,39.005 IC11.7@125.734,39.005 C28.2@126.844,39.005 ; IC11.9@125.009,39.505 IC11.8@125.734,39.505 C28.2@126.862,39.505
  TopLayer w0.508: IC4.2@120.24,44.65 121.637,44.65 ; L15.2@121.237,81.939 121.237,81.189 119.499,79.451 116.51,79.451 115.744,78.685 115.744,53.337 121.002,48.079 121.002,46.682 121.637,46.047 121.637,45.539 ; 121.637,45.412 121.637,44.65 ; C144.2@122.944,44.388 125.344,44.388 C3.2@125.444,44.288 126.6,44.288 126.897,43.991 126.897,39.47 C28.2@127.103,39.264 ; C144.2@122.944,44.65 121.637,44.65
  other v7: 123.834,38.255 124.834,38.255 123.834,39.255 124.834,39.255
NetC6_2: C6.2 IC4.3 | length 2.3
  TopLayer w0.508: C6.2@119.544,47.588 120.194,46.938 IC4.3@120.194,45.538
NetC16_1: C16.1 IC7.6 | length 3.2
  TopLayer w0.5: v1@126.896,51.823 IC7.6@127.92,51.823
  BottomLayer w0.5: v1(126.889,51.816) 128.111,51.816 C16.1@128.82,52.525
NetC16_2: C16.2 IC7.2 L2.1 | length 4.2
  TopLayer w0.5: IC7.2@130.62,52.773 v1(131.564,52.773) 132.509,52.773 132.766,53.03 L2.1@132.766,53.032
  BottomLayer w0.5: C16.2@129.72,52.525 130.832,52.525 131.081,52.773 v1(131.564,52.773)
NetC17_2: C17.2 C18.2 C136.1 C137.2 C138.2 C139.2 C140.2 C150.2 C151.2 IC1.1 IC6.22 IC6.23 IC7.3 IC35.2 IC35.3 L8.1 | length 69.1
  TopLayer w0.254: IC35.3@124.531,59.069 124.531,59.601 124.144,59.988 124.144,60.082 124.334,60.271 C150.2@124.531,60.271 ; C151.2@124.531,62.023 C150.2@124.531,60.271 ; IC35.2@125.032,59.069 125.032,59.924 124.685,60.271 C150.2@124.531,60.271
  TopLayer w0.5: v2(130.041,55.76) 130.022,55.741 130.022,54.985 130.092,54.915 130.092,53.976 130.345,53.723 IC7.3@130.62,53.723
  TopLayer w1: L8.1@119.438,64.638 119.938,64.138 122.559,64.138 v3(123.732,62.965) ; v3@123.909,62.742 C151.2@124.631,62.019
  BottomLayer w0.5: C18.2@129.37,56.804 129.37,56.629 130.022,55.977 130.022,55.779 v2(130.041,55.76)
  BottomLayer w1: v3(119.544,62.924) 120.421,63.801 121.976,63.801 122.811,62.965 v3(123.732,62.965) 131.574,62.965 132.334,62.206 133.35,62.206 ; C18.2@129.37,56.804 129.37,56.979 129.617,57.226 IC1.1@132.932,57.226 ; 133.215,56.229 C140.2@135.174,56.229 ; 134.199,58.229 C139.2@135.174,58.229 ; C138.2@135.174,60.229 133.35,60.229 ; C137.2@135.226,54.175 133.829,54.175 133.067,54.937 133.067,57.203 134.093,58.229 133.35,58.972 133.35,60.229 ; IC6.23@150.747,67.037 IC6.22@148.207,67.037 137.984,67.037 135.674,64.727 135.674,62.854 135.549,62.729 C136.1@135.274,62.729 133.873,62.729 133.35,62.206 ; 133.35,60.229 133.35,62.206
NetC27_2: C27.2 IC11.5 | length 1.9
  TopLayer w0.3: C27.2@125.231,36.319 125.556,36.644 125.556,37.202 125.734,37.38 IC11.5@125.734,38.005
NetC34_2: C34.2 IC12.5 | length 2
  TopLayer w0.254: C34.2@129.191,41.578 129.191,40.681 129.333,40.539 129.333,40.339 129.33,40.337 129.33,39.61 IC12.5@129.317,39.597
NetC37_2: C37.2 IC13.5 | length 2.4
  BottomLayer w0.254: C37.2@126.894,39.518 126.894,40.453 127.41,40.969 IC13.5@128.105,40.969
NetC56_1_1: C56_1.1 R24_1.2 R25_1.1 | length 4
  TopLayer w0.152: C56_1.1@59.066,11.76 58.636,11.33 R24_1.2@58.636,9.982 59.436,9.182 R25_1.1@59.436,8.242
NetC56_1_2: C56_1.2 IC2_1.6 R5_1.1 R7_1.1 R67_1.2 | length 20.4
  TopLayer w0.152: v1(49.24,9.139) 50.305,9.139 IC2_1.6@50.351,9.093 51.496,9.093 51.821,9.418 51.821,10.695 51.603,10.913 50.079,10.913 50,10.992 R67_1.2@50,12.014 ; v1(54.356,10.643) 55.024,11.311 55.31,11.311 55.759,11.76 C56_1.2@57.266,11.76
  BottomLayer w0.152: R5_1.1@48.207,6.794 R5_1.1@48.207,7.188 ; R5_1.1@48.244,7.188 R7_1.1@48.244,8.888 49.044,8.888 49.24,9.084 v1(49.24,9.139) 49.24,10.232 50.216,11.208 52.873,11.208 53.438,10.643 v1(54.356,10.643)
NetC56_2_1: C56_2.1 R24_2.2 R25_2.1 | length 4
  TopLayer w0.152: C56_2.1@83.866,9.26 83.436,8.83 R24_2.2@83.436,7.482 84.236,6.682 R25_2.1@84.236,5.742
NetC56_2_2: C56_2.2 IC2_2.6 R5_2.1 R7_2.1 R67_2.2 | length 20.4
  TopLayer w0.152: v1(74.04,6.639) 75.105,6.639 IC2_2.6@75.151,6.593 76.296,6.593 76.621,6.918 76.621,8.195 76.403,8.413 74.879,8.413 74.8,8.492 R67_2.2@74.8,9.514 ; v1(79.156,8.143) 79.824,8.811 80.11,8.811 80.559,9.26 C56_2.2@82.066,9.26
  BottomLayer w0.152: R5_2.1@72.944,4.688 R7_2.1@72.944,6.288 73.689,6.288 v1(74.04,6.639) 74.04,7.732 75.016,8.708 77.673,8.708 78.238,8.143 v1(79.156,8.143) ; R5_2.1@73.007,4.294 R5_2.1@73.007,4.688
NetC56_3_1: C56_3.1 R24_3.2 R25_3.1 | length 4
  TopLayer w0.152: C56_3.1@59.066,18.76 58.636,18.33 R24_3.2@58.636,16.982 59.436,16.182 R25_3.1@59.436,15.242
NetC56_3_2: C56_3.2 IC2_3.6 R5_3.1 R7_3.1 R67_3.2 | length 19.9
  TopLayer w0.152: v1(49.24,16.139) 50.305,16.139 IC2_3.6@50.351,16.093 51.496,16.093 51.821,16.418 51.821,17.695 51.603,17.913 50.079,17.913 50,17.992 R67_3.2@50,19.014 ; v1(54.356,17.643) 55.024,18.311 55.31,18.311 55.759,18.76 C56_3.2@57.266,18.76
  BottomLayer w0.152: R7_3.1@48.444,14.088 R5_3.1@48.444,15.888 48.695,16.139 v1(49.24,16.139) 49.24,17.232 50.216,18.208 52.873,18.208 53.438,17.643 v1(54.356,17.643)
NetC56_4_1: C56_4.1 R24_4.2 R25_4.1 | length 4
  TopLayer w0.152: C56_4.1@83.866,16.26 83.436,15.83 R24_4.2@83.436,14.482 84.236,13.682 R25_4.1@84.236,12.742
NetC56_4_2: C56_4.2 IC2_4.6 R5_4.1 R7_4.1 R67_4.2 | length 20.3
  TopLayer w0.152: v1(74.04,13.639) 75.105,13.639 IC2_4.6@75.151,13.593 76.296,13.593 76.621,13.918 76.621,15.195 76.403,15.413 74.879,15.413 74.8,15.492 R67_4.2@74.8,16.514 ; v1(79.156,15.143) 79.824,15.811 80.11,15.811 80.559,16.26 C56_4.2@82.066,16.26
  BottomLayer w0.152: R7_4.1@73.007,11.294 R7_4.1@73.007,11.588 ; R7_4.1@73.044,11.588 R5_4.1@73.044,13.288 73.689,13.288 v1(74.04,13.639) 74.04,14.732 75.016,15.708 77.673,15.708 78.238,15.143 v1(79.156,15.143)
NetC56_5_1: C56_5.1 R24_5.2 R25_5.1 | length 4
  TopLayer w0.152: C56_5.1@59.066,25.76 58.636,25.33 R24_5.2@58.636,23.982 59.436,23.182 R25_5.1@59.436,22.242
NetC56_5_2: C56_5.2 IC2_5.6 R5_5.1 R7_5.1 R67_5.2 | length 20.4
  TopLayer w0.152: v1(49.24,23.139) 50.305,23.139 IC2_5.6@50.351,23.093 51.496,23.093 51.821,23.418 51.821,24.695 51.603,24.913 50.079,24.913 50,24.992 R67_5.2@50,26.014 ; v1(54.356,24.643) 55.024,25.311 55.31,25.311 55.759,25.76 C56_5.2@57.266,25.76
  BottomLayer w0.152: R7_5.1@48.207,20.794 R7_5.1@48.207,21.088 ; R7_5.1@48.244,21.088 R5_5.1@48.244,22.888 48.989,22.888 v1(49.24,23.139) 49.24,24.232 50.216,25.208 52.873,25.208 53.438,24.643 v1(54.356,24.643)
NetC56_6_1: C56_6.1 R24_6.2 R25_6.1 | length 4
  TopLayer w0.152: C56_6.1@83.866,23.26 83.436,22.83 R24_6.2@83.436,21.482 84.236,20.682 R25_6.1@84.236,19.742
NetC56_6_2: C56_6.2 IC2_6.6 R5_6.1 R7_6.1 R67_6.2 | length 20.2
  TopLayer w0.152: v1(74.04,20.639) 75.105,20.639 IC2_6.6@75.151,20.593 76.296,20.593 76.621,20.918 76.621,22.195 76.403,22.413 74.879,22.413 74.8,22.492 R67_6.2@74.8,23.514 ; v1(79.156,22.143) 79.824,22.811 80.11,22.811 80.559,23.26 C56_6.2@82.066,23.26
  BottomLayer w0.152: R7_6.1@73.007,18.294 73.007,19.905 R5_6.1@73.317,20.215 ; v1(74.04,20.639) 74.04,21.732 75.016,22.708 77.673,22.708 78.238,22.143 v1(79.156,22.143)
  BottomLayer w0.508: R5_6.1@73.144,20.388 73.395,20.639 v1(74.04,20.639)
NetC56_7_1: C56_7.1 R24_7.2 R25_7.1 | length 4
  TopLayer w0.152: C56_7.1@59.066,32.76 58.636,32.33 R24_7.2@58.636,30.982 59.436,30.182 R25_7.1@59.436,29.242
NetC56_7_2: C56_7.2 IC2_7.6 R5_7.1 R7_7.1 R67_7.2 | length 20.4
  TopLayer w0.152: v1(49.24,30.139) 50.305,30.139 IC2_7.6@50.351,30.093 51.496,30.093 51.821,30.418 51.821,31.695 51.603,31.913 50.079,31.913 50,31.992 R67_7.2@50,33.014 ; v1(54.356,31.643) 55.024,32.311 55.31,32.311 55.759,32.76 C56_7.2@57.266,32.76
  BottomLayer w0.152: R7_7.1@48.207,27.794 R7_7.1@48.207,28.088 ; R7_7.1@48.244,28.088 R5_7.1@48.244,29.888 48.989,29.888 v1(49.24,30.139) 49.24,31.232 50.216,32.208 52.873,32.208 53.438,31.643 v1(54.356,31.643)
NetC56_8_1: C56_8.1 R24_8.2 R25_8.1 | length 4
  TopLayer w0.152: C56_8.1@83.866,30.26 83.436,29.83 R24_8.2@83.436,28.482 84.236,27.682 R25_8.1@84.236,26.742
NetC56_8_2: C56_8.2 IC2_8.6 R5_8.1 R7_8.1 R67_8.2 | length 20.4
  TopLayer w0.152: v1(74.04,27.639) 75.105,27.639 IC2_8.6@75.151,27.593 76.296,27.593 76.621,27.918 76.621,29.195 76.403,29.413 74.879,29.413 74.8,29.492 R67_8.2@74.8,30.514 ; v1(79.156,29.143) 79.824,29.811 80.11,29.811 80.559,30.26 C56_8.2@82.066,30.26
  BottomLayer w0.152: R7_8.1@73.007,25.294 73.007,27.351 R5_8.1@73.144,27.488 73.295,27.639 v1(74.04,27.639) 74.04,28.732 75.016,29.708 77.673,29.708 78.238,29.143 v1(79.156,29.143)
NetC56_9_1: C56_9.1 R24_9.2 R25_9.1 | length 4
  TopLayer w0.152: C56_9.1@107.066,30.51 106.636,30.08 R24_9.2@106.636,28.732 107.436,27.932 R25_9.1@107.436,26.992
NetC56_9_2: C56_9.2 IC2_9.6 R5_9.1 R7_9.1 R67_9.2 | length 20.5
  TopLayer w0.152: v1(97.24,27.889) 98.305,27.889 IC2_9.6@98.351,27.843 99.496,27.843 99.821,28.168 99.821,29.445 99.603,29.663 98.079,29.663 98,29.742 R67_9.2@98,30.764 ; v1(102.356,29.393) 103.024,30.061 103.31,30.061 103.759,30.51 C56_9.2@105.266,30.51
  BottomLayer w0.152: R7_9.1@96.207,25.544 96.207,27.155 R5_9.1@96.543,27.491 ; R5_9.1@96.344,27.69 R5_9.1@96.742,27.69 ; R5_9.1@96.544,27.492 R5_9.1@96.742,27.69 ; v1(102.356,29.393) 101.438,29.393 100.873,29.958 98.216,29.958 97.24,28.982 v1(97.24,27.889) 97.04,27.69 R5_9.1@96.742,27.69
NetC56_10_1: C56_10.1 R24_10.2 R25_10.1 | length 4
  TopLayer w0.152: C56_10.1@59.066,39.76 58.636,39.33 R24_10.2@58.636,37.982 59.436,37.182 R25_10.1@59.436,36.242
NetC56_10_2: C56_10.2 IC2_10.6 R5_10.1 R7_10.1 R67_10.2 | length 19.9
  TopLayer w0.152: v1(49.24,37.139) 50.305,37.139 IC2_10.6@50.351,37.093 51.496,37.093 51.821,37.418 51.821,38.695 51.603,38.913 50.079,38.913 50,38.992 R67_10.2@50,40.014 ; v1(54.356,38.643) 55.024,39.311 55.31,39.311 55.759,39.76 C56_10.2@57.266,39.76
  BottomLayer w0.152: R7_10.1@48.344,35.188 R5_10.1@48.344,36.888 48.595,37.139 v1(49.24,37.139) 49.24,38.232 50.216,39.208 52.873,39.208 53.438,38.643 v1(54.356,38.643)
NetC56_11_1: C56_11.1 R24_11.2 R25_11.1 | length 4
  TopLayer w0.152: C56_11.1@83.866,37.26 83.436,36.83 R24_11.2@83.436,35.482 84.236,34.682 R25_11.1@84.236,33.742
NetC56_11_2: C56_11.2 IC2_11.6 R5_11.1 R7_11.1 R67_11.2 | length 20.6
  TopLayer w0.152: v1(74.04,34.639) 75.105,34.639 IC2_11.6@75.151,34.593 76.296,34.593 76.621,34.918 76.621,36.195 76.403,36.413 74.879,36.413 74.8,36.492 R67_11.2@74.8,37.514 ; v1(79.156,36.143) 79.824,36.811 80.11,36.811 80.559,37.26 C56_11.2@82.066,37.26
  BottomLayer w0.152: R7_11.1@72.944,32.588 72.944,34.288 R5_11.1@72.844,34.388 73.644,34.388 73.895,34.639 v1(74.04,34.639) 74.04,35.732 75.016,36.708 77.673,36.708 78.238,36.143 v1(79.156,36.143) ; R7_11.1@73.007,32.294 R7_11.1@73.007,32.588
NetC56_12_1: C56_12.1 R24_12.2 R25_12.1 | length 4
  TopLayer w0.152: C56_12.1@107.066,37.51 106.636,37.08 R24_12.2@106.636,35.732 107.436,34.932 R25_12.1@107.436,33.992
NetC56_12_2: C56_12.2 IC2_12.6 R5_12.1 R7_12.1 R67_12.2 | length 20.3
  TopLayer w0.152: v1(97.24,34.889) 98.305,34.889 IC2_12.6@98.351,34.843 99.496,34.843 99.821,35.168 99.821,36.445 99.603,36.663 98.079,36.663 98,36.742 R67_12.2@98,37.764 ; v1(102.356,36.393) 103.024,37.061 103.31,37.061 103.759,37.51 C56_12.2@105.266,37.51
  BottomLayer w0.152: R7_12.1@96.207,32.544 96.207,34.155 R5_12.1@96.442,34.39 ; R5_12.1@96.244,34.588 96.84,34.588 v1@97.14,34.889 ; v1(97.24,34.889) v1@97.14,34.889 ; v1(102.356,36.393) 101.438,36.393 100.873,36.958 98.216,36.958 97.24,35.982 97.24,34.988 v1@97.14,34.889
NetC56_13_1: C56_13.1 R24_13.2 R25_13.1 | length 4
  TopLayer w0.152: C56_13.1@59.066,46.76 58.636,46.33 R24_13.2@58.636,44.982 59.436,44.182 R25_13.1@59.436,43.242
NetC56_13_2: C56_13.2 IC2_13.6 R5_13.1 R7_13.1 R67_13.2 | length 20.5
  TopLayer w0.152: v1(49.24,44.139) 50.305,44.139 IC2_13.6@50.351,44.093 51.496,44.093 51.821,44.418 51.821,45.695 51.603,45.913 50.079,45.913 50,45.992 R67_13.2@50,47.014 ; v1(54.356,45.643) 55.024,46.311 55.31,46.311 55.759,46.76 C56_13.2@57.266,46.76
  BottomLayer w0.152: R7_13.1@48.207,41.794 R7_13.1@48.207,42.088 ; R7_13.1@48.244,42.088 48.244,43.788 R5_13.1@48.144,43.888 48.395,44.139 v1(49.24,44.139) 49.24,45.232 50.216,46.208 52.873,46.208 53.438,45.643 v1(54.356,45.643)
NetC56_14_1: C56_14.1 R24_14.2 R25_14.1 | length 4
  TopLayer w0.152: C56_14.1@83.866,44.26 83.436,43.83 R24_14.2@83.436,42.482 84.236,41.682 R25_14.1@84.236,40.742
NetC56_14_2: C56_14.2 IC2_14.6 R5_14.1 R7_14.1 R67_14.2 | length 20.1
  TopLayer w0.152: v1(74.04,41.639) 75.105,41.639 IC2_14.6@75.151,41.593 76.296,41.593 76.621,41.918 76.621,43.195 76.403,43.413 74.879,43.413 74.8,43.492 R67_14.2@74.8,44.514 ; v1(79.156,43.143) 79.824,43.811 80.11,43.811 80.559,44.26 C56_14.2@82.066,44.26
  BottomLayer w0.152: R7_14.1@73.007,39.294 73.007,40.905 73.741,41.639 v1(74.04,41.639) 74.04,42.732 75.016,43.708 77.673,43.708 78.238,43.143 v1(79.156,43.143)
NetC56_15_1: C56_15.1 R24_15.2 R25_15.1 | length 4
  TopLayer w0.152: C56_15.1@107.066,44.51 106.636,44.08 R24_15.2@106.636,42.732 107.436,41.932 R25_15.1@107.436,40.992
NetC56_15_2: C56_15.2 IC2_15.6 R5_15.1 R7_15.1 R67_15.2 | length 20.4
  TopLayer w0.152: v1(97.24,41.889) 98.305,41.889 IC2_15.6@98.351,41.843 99.496,41.843 99.821,42.168 99.821,43.445 99.603,43.663 98.079,43.663 98,43.742 R67_15.2@98,44.764 ; v1(102.356,43.393) 103.024,44.061 103.31,44.061 103.759,44.51 C56_15.2@105.266,44.51
  BottomLayer w0.152: R7_15.1@96.207,39.544 96.207,41.651 96.445,41.889 v1(97.24,41.889) 97.24,42.982 98.216,43.958 100.873,43.958 101.438,43.393 v1(102.356,43.393)
NetC56_16_1: C56_16.1 R24_16.2 R25_16.1 | length 4
  TopLayer w0.152: C56_16.1@59.066,53.76 58.636,53.33 R24_16.2@58.636,51.982 59.436,51.182 R25_16.1@59.436,50.242
NetC56_16_2: C56_16.2 IC2_16.6 R5_16.1 R7_16.1 R67_16.2 | length 20.4
  TopLayer w0.152: v1(49.24,51.139) 50.305,51.139 IC2_16.6@50.351,51.093 51.496,51.093 51.821,51.418 51.821,52.695 51.603,52.913 50.079,52.913 50,52.992 R67_16.2@50,54.014 ; v1(54.356,52.643) 55.024,53.311 55.31,53.311 55.759,53.76 C56_16.2@57.266,53.76
  BottomLayer w0.152: R7_16.1@48.144,49.088 48.144,50.788 R5_16.1@48.244,50.888 48.495,51.139 v1(49.24,51.139) 49.24,52.232 50.216,53.208 52.873,53.208 53.438,52.643 v1(54.356,52.643) ; R7_16.1@48.207,48.794 R7_16.1@48.207,49.088
NetC56_17_1: C56_17.1 R24_17.2 R25_17.1 | length 4
  TopLayer w0.152: C56_17.1@83.866,51.26 83.436,50.83 R24_17.2@83.436,49.482 84.236,48.682 R25_17.1@84.236,47.742
NetC56_17_2: C56_17.2 IC2_17.6 R5_17.1 R7_17.1 R67_17.2 | length 20.5
  TopLayer w0.152: v1(74.04,48.639) 75.105,48.639 IC2_17.6@75.151,48.593 76.296,48.593 76.621,48.918 76.621,50.195 76.403,50.413 74.879,50.413 74.8,50.492 R67_17.2@74.8,51.514 ; v1(79.156,50.143) 79.824,50.811 80.11,50.811 80.559,51.26 C56_17.2@82.066,51.26
  BottomLayer w0.152: R7_17.1@73.007,46.294 R7_17.1@73.007,46.588 ; R7_17.1@73.044,46.588 73.044,48.288 R5_17.1@72.944,48.388 73.789,48.388 v1(74.04,48.639) 74.04,49.732 75.016,50.708 77.673,50.708 78.238,50.143 v1(79.156,50.143)
NetC56_18_1: C56_18.1 R24_18.2 R25_18.1 | length 4
  TopLayer w0.152: C56_18.1@107.066,51.51 106.636,51.08 R24_18.2@106.636,49.732 107.436,48.932 R25_18.1@107.436,47.992
NetC56_18_2: C56_18.2 IC2_18.6 R5_18.1 R7_18.1 R67_18.2 | length 20.1
  TopLayer w0.152: v1(97.24,48.889) 98.305,48.889 IC2_18.6@98.351,48.843 99.496,48.843 99.821,49.168 99.821,50.445 99.603,50.663 98.079,50.663 98,50.742 R67_18.2@98,51.764 ; v1(102.356,50.393) 103.024,51.061 103.31,51.061 103.759,51.51 C56_18.2@105.266,51.51
  BottomLayer w0.127: R5_18.1@96.344,46.888 96.344,48.588 R7_18.1@96.244,48.688 96.445,48.889 v1(97.24,48.889)
  BottomLayer w0.152: v1(97.24,48.889) 97.24,49.982 98.216,50.958 100.873,50.958 101.438,50.393 v1(102.356,50.393)
NetC56_19_1: C56_19.1 R24_19.2 R25_19.1 | length 4
  TopLayer w0.152: C56_19.1@59.066,60.76 58.636,60.33 R24_19.2@58.636,58.982 59.436,58.182 R25_19.1@59.436,57.242
NetC56_19_2: C56_19.2 IC2_19.6 R5_19.1 R7_19.1 R67_19.2 | length 20.2
  TopLayer w0.152: v1(49.24,58.139) 50.305,58.139 IC2_19.6@50.351,58.093 51.496,58.093 51.821,58.418 51.821,59.695 51.603,59.913 50.079,59.913 50,59.992 R67_19.2@50,61.014 ; v1(54.356,59.643) 55.024,60.311 55.31,60.311 55.759,60.76 C56_19.2@57.266,60.76
  BottomLayer w0.152: R5_19.1@48.344,56.088 48.344,57.588 R7_19.1@48.144,57.788 48.495,58.139 v1(49.24,58.139) 49.24,59.232 50.216,60.208 52.873,60.208 53.438,59.643 v1(54.356,59.643)
NetC56_20_1: C56_20.1 R24_20.2 R25_20.1 | length 4
  TopLayer w0.152: C56_20.1@83.866,58.26 83.436,57.83 R24_20.2@83.436,56.482 84.236,55.682 R25_20.1@84.236,54.742
NetC56_20_2: C56_20.2 IC2_20.6 R5_20.1 R7_20.1 R67_20.2 | length 20
  TopLayer w0.152: v1(74.04,55.639) 75.105,55.639 IC2_20.6@75.151,55.593 76.296,55.593 76.621,55.918 76.621,57.195 76.403,57.413 74.879,57.413 74.8,57.492 R67_20.2@74.8,58.514 ; v1(79.156,57.143) 79.824,57.811 80.11,57.811 80.559,58.26 C56_20.2@82.066,58.26
  BottomLayer w0.152: R7_20.1@73.144,53.588 R5_20.1@73.144,55.388 73.395,55.639 v1(74.04,55.639) 74.04,56.732 75.016,57.708 77.673,57.708 78.238,57.143 v1(79.156,57.143)
NetC56_21_1: C56_21.1 R24_21.2 R25_21.1 | length 4
  TopLayer w0.152: C56_21.1@107.066,58.51 106.636,58.08 R24_21.2@106.636,56.732 107.436,55.932 R25_21.1@107.436,54.992
NetC56_21_2: C56_21.2 IC2_21.6 R5_21.1 R7_21.1 R67_21.2 | length 20.3
  TopLayer w0.152: v1(97.24,55.889) 98.305,55.889 IC2_21.6@98.351,55.843 99.496,55.843 99.821,56.168 99.821,57.445 99.603,57.663 98.079,57.663 98,57.742 R67_21.2@98,58.764 ; v1(102.356,57.393) 103.024,58.061 103.31,58.061 103.759,58.51 C56_21.2@105.266,58.51
  BottomLayer w0.152: R7_21.1@96.207,53.544 R7_21.1@96.207,53.888 ; R7_21.1@96.244,53.888 96.244,55.488 R5_21.1@96.344,55.588 96.944,55.588 97.24,55.884 v1(97.24,55.889) 97.24,56.982 98.216,57.958 100.873,57.958 101.438,57.393 v1(102.356,57.393)
NetC56_22_1: C56_22.1 R24_22.2 R25_22.1 | length 4
  TopLayer w0.152: C56_22.1@59.066,67.76 58.636,67.33 R24_22.2@58.636,65.982 59.436,65.182 R25_22.1@59.436,64.242
NetC56_22_2: C56_22.2 IC2_22.6 R5_22.1 R7_22.1 R67_22.2 | length 20.4
  TopLayer w0.152: v1(49.24,65.139) 50.305,65.139 IC2_22.6@50.351,65.093 51.496,65.093 51.821,65.418 51.821,66.695 51.603,66.913 50.079,66.913 50,66.992 R67_22.2@50,68.014 ; v1(54.356,66.643) 55.024,67.311 55.31,67.311 55.759,67.76 C56_22.2@57.266,67.76
  BottomLayer w0.152: R7_22.1@48.207,62.794 R7_22.1@48.207,63.088 ; R7_22.1@48.244,63.088 R5_22.1@48.244,64.888 48.495,65.139 v1(49.24,65.139) 49.24,66.232 50.216,67.208 52.873,67.208 53.438,66.643 v1(54.356,66.643)
NetC56_23_1: C56_23.1 R24_23.2 R25_23.1 | length 4
  TopLayer w0.152: C56_23.1@83.866,65.26 83.436,64.83 R24_23.2@83.436,63.482 84.236,62.682 R25_23.1@84.236,61.742
NetC56_23_2: C56_23.2 IC2_23.6 R5_23.1 R7_23.1 R67_23.2 | length 20.5
  TopLayer w0.152: v1(74.04,62.639) 75.105,62.639 IC2_23.6@75.151,62.593 76.296,62.593 76.621,62.918 76.621,64.195 76.403,64.413 74.879,64.413 74.8,64.492 R67_23.2@74.8,65.514 ; v1(79.156,64.143) 79.824,64.811 80.11,64.811 80.559,65.26 C56_23.2@82.066,65.26
  BottomLayer w0.152: R7_23.1@72.644,60.588 R5_23.1@72.644,62.388 72.895,62.639 v1(74.04,62.639) 74.04,63.732 75.016,64.708 77.673,64.708 78.238,64.143 v1(79.156,64.143)
NetC56_24_1: C56_24.1 R24_24.2 R25_24.1 | length 4
  TopLayer w0.152: C56_24.1@107.066,65.51 106.636,65.08 R24_24.2@106.636,63.732 107.436,62.932 R25_24.1@107.436,61.992
NetC56_24_2: C56_24.2 IC2_24.6 R5_24.1 R7_24.1 R67_24.2 | length 20.3
  TopLayer w0.152: v1(97.24,62.889) 98.305,62.889 IC2_24.6@98.351,62.843 99.496,62.843 99.821,63.168 99.821,64.445 99.603,64.663 98.079,64.663 98,64.742 R67_24.2@98,65.764 ; v1(102.356,64.393) 103.024,65.061 103.31,65.061 103.759,65.51 C56_24.2@105.266,65.51
  BottomLayer w0.152: R7_24.1@96.207,60.544 R7_24.1@96.207,60.888 ; R7_24.1@96.244,60.888 96.244,62.488 R5_24.1@96.344,62.588 96.645,62.889 v1(97.24,62.889) 97.24,63.982 98.216,64.958 100.873,64.958 101.438,64.393 v1(102.356,64.393)
NetC56_25_1: C56_25.1 R24_25.2 R25_25.1 | length 4
  TopLayer w0.152: C56_25.1@59.066,74.76 58.636,74.33 R24_25.2@58.636,72.982 59.436,72.182 R25_25.1@59.436,71.242
NetC56_25_2: C56_25.2 IC2_25.6 R5_25.1 R7_25.1 R67_25.2 | length 20
  TopLayer w0.152: v1(49.24,72.139) 50.305,72.139 IC2_25.6@50.351,72.093 51.496,72.093 51.821,72.418 51.821,73.695 51.603,73.913 50.079,73.913 50,73.992 R67_25.2@50,75.014 ; v1(54.356,73.643) 55.024,74.311 55.31,74.311 55.759,74.76 C56_25.2@57.266,74.76
  BottomLayer w0.152: R7_25.1@48.344,70.088 R5_25.1@48.344,71.888 48.595,72.139 v1(49.24,72.139) 49.24,73.232 50.216,74.208 52.873,74.208 53.438,73.643 v1(54.356,73.643)
NetC56_26_1: C56_26.1 R24_26.2 R25_26.1 | length 4
  TopLayer w0.152: C56_26.1@83.866,72.26 83.436,71.83 R24_26.2@83.436,70.482 84.236,69.682 R25_26.1@84.236,68.742
NetC56_26_2: C56_26.2 IC2_26.6 R5_26.1 R7_26.1 R67_26.2 | length 20.3
  TopLayer w0.152: v1(74.04,69.639) 75.105,69.639 IC2_26.6@75.151,69.593 76.296,69.593 76.621,69.918 76.621,71.195 76.403,71.413 74.879,71.413 74.8,71.492 R67_26.2@74.8,72.514 ; v1(79.156,71.143) 79.824,71.811 80.11,71.811 80.559,72.26 C56_26.2@82.066,72.26
  BottomLayer w0.152: R7_26.1@72.744,67.688 R5_26.1@72.744,69.388 72.995,69.639 v1(74.04,69.639) 74.04,70.732 75.016,71.708 77.673,71.708 78.238,71.143 v1(79.156,71.143)
NetC56_27_1: C56_27.1 R24_27.2 R25_27.1 | length 4
  TopLayer w0.152: C56_27.1@107.066,72.51 106.636,72.08 R24_27.2@106.636,70.732 107.436,69.932 R25_27.1@107.436,68.992
NetC56_27_2: C56_27.2 IC2_27.6 R5_27.1 R7_27.1 R67_27.2 | length 20.2
  TopLayer w0.152: v1(97.24,69.889) 98.305,69.889 IC2_27.6@98.351,69.843 99.496,69.843 99.821,70.168 99.821,71.445 99.603,71.663 98.079,71.663 98,71.742 R67_27.2@98,72.764 ; v1(102.356,71.393) 103.024,72.061 103.31,72.061 103.759,72.51 C56_27.2@105.266,72.51
  BottomLayer w0.152: R7_27.1@96.044,67.888 R5_27.1@96.044,69.588 96.844,69.588 97.145,69.889 v1(97.24,69.889) 97.24,70.982 98.216,71.958 100.873,71.958 101.438,71.393 v1(102.356,71.393)
NetC56_28_1: C56_28.1 R24_28.2 R25_28.1 | length 4
  TopLayer w0.152: C56_28.1@59.066,81.76 58.636,81.33 R24_28.2@58.636,79.982 59.436,79.182 R25_28.1@59.436,78.242
NetC56_28_2: C56_28.2 IC2_28.6 R5_28.1 R7_28.1 R67_28.2 | length 20.1
  TopLayer w0.152: v1(49.24,79.139) 50.305,79.139 IC2_28.6@50.351,79.093 51.496,79.093 51.821,79.418 51.821,80.695 51.603,80.913 50.079,80.913 50,80.992 R67_28.2@50,82.014 ; v1(54.356,80.643) 55.024,81.311 55.31,81.311 55.759,81.76 C56_28.2@57.266,81.76
  BottomLayer w0.152: R7_28.1@48.207,76.794 48.207,78.405 48.941,79.139 v1(49.24,79.139) 49.24,80.232 50.216,81.208 52.873,81.208 53.438,80.643 v1(54.356,80.643)
NetC56_29_1: C56_29.1 R24_29.2 R25_29.1 | length 4
  TopLayer w0.152: C56_29.1@83.866,79.26 83.436,78.83 R24_29.2@83.436,77.482 84.236,76.682 R25_29.1@84.236,75.742
NetC56_29_2: C56_29.2 IC2_29.6 R5_29.1 R7_29.1 R67_29.2 | length 20.6
  TopLayer w0.152: v1(74.04,76.639) 75.105,76.639 IC2_29.6@75.151,76.593 76.296,76.593 76.621,76.918 76.621,78.195 76.403,78.413 74.879,78.413 74.8,78.492 R67_29.2@74.8,79.514 ; v1(79.156,78.143) 79.824,78.811 80.11,78.811 80.559,79.26 C56_29.2@82.066,79.26
  BottomLayer w0.152: R7_29.1@73.007,74.294 73.007,76.126 R5_29.1@72.844,76.288 73.195,76.639 v1(74.04,76.639) 74.04,77.732 75.016,78.708 77.673,78.708 78.238,78.143 v1(79.156,78.143)
NetC56_30_1: C56_30.1 R24_30.2 R25_30.1 | length 4
  TopLayer w0.152: C56_30.1@107.066,79.51 106.636,79.08 R24_30.2@106.636,77.732 107.436,76.932 R25_30.1@107.436,75.992
NetC56_30_2: C56_30.2 IC2_30.6 R5_30.1 R7_30.1 R67_30.2 | length 20.4
  TopLayer w0.152: v1(97.24,76.889) 98.305,76.889 IC2_30.6@98.351,76.843 99.496,76.843 99.821,77.168 99.821,78.445 99.603,78.663 98.079,78.663 98,78.742 R67_30.2@98,79.764 ; v1(102.356,78.393) 103.024,79.061 103.31,79.061 103.759,79.51 C56_30.2@105.266,79.51
  BottomLayer w0.152: R7_30.1@96.207,74.544 R7_30.1@96.207,74.888 ; R7_30.1@96.244,74.888 R5_30.1@96.244,76.588 96.344,76.588 96.645,76.889 v1(97.24,76.889) 97.24,77.982 98.216,78.958 100.873,78.958 101.438,78.393 v1(102.356,78.393)
NetC56_31_1: C56_31.1 R24_31.2 R25_31.1 | length 4
  TopLayer w0.152: C56_31.1@83.866,86.26 83.436,85.83 R24_31.2@83.436,84.482 84.236,83.682 R25_31.1@84.236,82.742
NetC56_31_2: C56_31.2 IC2_31.6 R5_31.1 R7_31.1 R67_31.2 | length 21
  TopLayer w0.152: v1(74.04,83.639) 75.105,83.639 IC2_31.6@75.151,83.593 76.296,83.593 76.621,83.918 76.621,85.195 76.403,85.413 74.879,85.413 74.8,85.492 R67_31.2@74.8,86.514 ; v1(79.156,85.143) 79.824,85.811 80.11,85.811 80.559,86.26 C56_31.2@82.066,86.26
  BottomLayer w0.152: R7_31.1@73.007,81.294 73.007,82.905 73.741,83.639 ; R5_31.1@73.144,83.388 73.144,83.588 73.195,83.639 73.741,83.639 ; v1(79.156,85.143) 78.238,85.143 77.673,85.708 75.016,85.708 74.04,84.732 v1(74.04,83.639) 73.741,83.639
NetC56_32_1: C56_32.1 R24_32.2 R25_32.1 | length 4
  TopLayer w0.152: C56_32.1@107.066,86.51 106.636,86.08 R24_32.2@106.636,84.732 107.436,83.932 R25_32.1@107.436,82.992
NetC56_32_2: C56_32.2 IC2_32.6 R5_32.1 R7_32.1 R67_32.2 | length 20.4
  TopLayer w0.152: v1(97.24,83.889) 98.305,83.889 IC2_32.6@98.351,83.843 99.496,83.843 99.821,84.168 99.821,85.445 99.603,85.663 98.079,85.663 98,85.742 R67_32.2@98,86.764 ; v1(102.356,85.393) 103.024,86.061 103.31,86.061 103.759,86.51 C56_32.2@105.266,86.51
  BottomLayer w0.152: R7_32.1@96.207,81.544 R7_32.1@96.207,81.888 ; R7_32.1@96.244,81.888 R5_32.1@96.244,83.588 96.644,83.988 97.046,83.988 v1@97.145,83.889 ; v1(97.24,83.889) 97.24,84.982 98.216,85.958 100.873,85.958 101.438,85.393 v1(102.356,85.393)
NetC61_1_2: C61_1.2 IC2_1.3 R25_1.2 | length 4.7
  TopLayer w0.152: IC2_1.3@55.751,9.093 57.061,9.093 C61_1.2@57.912,8.242 58.712,7.442 58.712,7.366 R25_1.2@59.436,6.642
NetC61_2_2: C61_2.2 IC2_2.3 R25_2.2 | length 4.8
  TopLayer w0.152: IC2_2.3@80.551,6.593 81.861,6.593 83.512,4.942 83.512,4.82 84.19,4.142 R25_2.2@84.236,4.142
NetC61_3_2: C61_3.2 IC2_3.3 R25_3.2 | length 4.7
  TopLayer w0.152: IC2_3.3@55.751,16.093 57.061,16.093 58.712,14.442 58.712,14.366 R25_3.2@59.436,13.642
NetC61_4_2: C61_4.2 IC2_4.3 R25_4.2 | length 4.7
  TopLayer w0.152: IC2_4.3@80.551,13.593 81.861,13.593 83.512,11.942 83.512,11.866 R25_4.2@84.236,11.142
NetC61_5_2: C61_5.2 IC2_5.3 R25_5.2 | length 4.7
  TopLayer w0.152: IC2_5.3@55.751,23.093 57.061,23.093 C61_5.2@57.912,22.242 58.712,21.442 58.712,21.366 R25_5.2@59.436,20.642
NetC61_6_2: C61_6.2 IC2_6.3 R25_6.2 | length 4.7
  TopLayer w0.152: IC2_6.3@80.551,20.593 81.861,20.593 83.512,18.942 83.512,18.866 R25_6.2@84.236,18.142
NetC61_7_2: C61_7.2 IC2_7.3 R25_7.2 | length 4.7
  TopLayer w0.152: IC2_7.3@55.751,30.093 57.061,30.093 58.712,28.442 58.712,28.366 R25_7.2@59.436,27.642
NetC61_8_2: C61_8.2 IC2_8.3 R25_8.2 | length 4.7
  TopLayer w0.152: IC2_8.3@80.551,27.593 81.861,27.593 C61_8.2@82.712,26.742 83.512,25.942 83.512,25.866 R25_8.2@84.236,25.142
NetC61_9_2: C61_9.2 IC2_9.3 R25_9.2 | length 4.7
  TopLayer w0.152: IC2_9.3@103.751,27.843 105.061,27.843 C61_9.2@105.912,26.992 106.944,25.96 106.944,25.884 R25_9.2@107.436,25.392
NetC61_10_2: C61_10.2 IC2_10.3 R25_10.2 | length 4.7
  TopLayer w0.152: IC2_10.3@55.751,37.093 57.061,37.093 59.436,34.718 R25_10.2@59.436,34.642